# Altium PCB Karta_ILS.PCBDOC (part 4 of 9)
Units mm, origin at the board's own origin, x right, y up, seen from the top; angles counter-clockwise.
Board outline 70 x 83.2 mm, 6 copper layers (TopLayer, Layer 1, Layer 2, Layer 3, Layer 4, Bottom Layer), stack 0.914 mm thick; 406 components, 271 nets, 1327 pads, 719 vias.
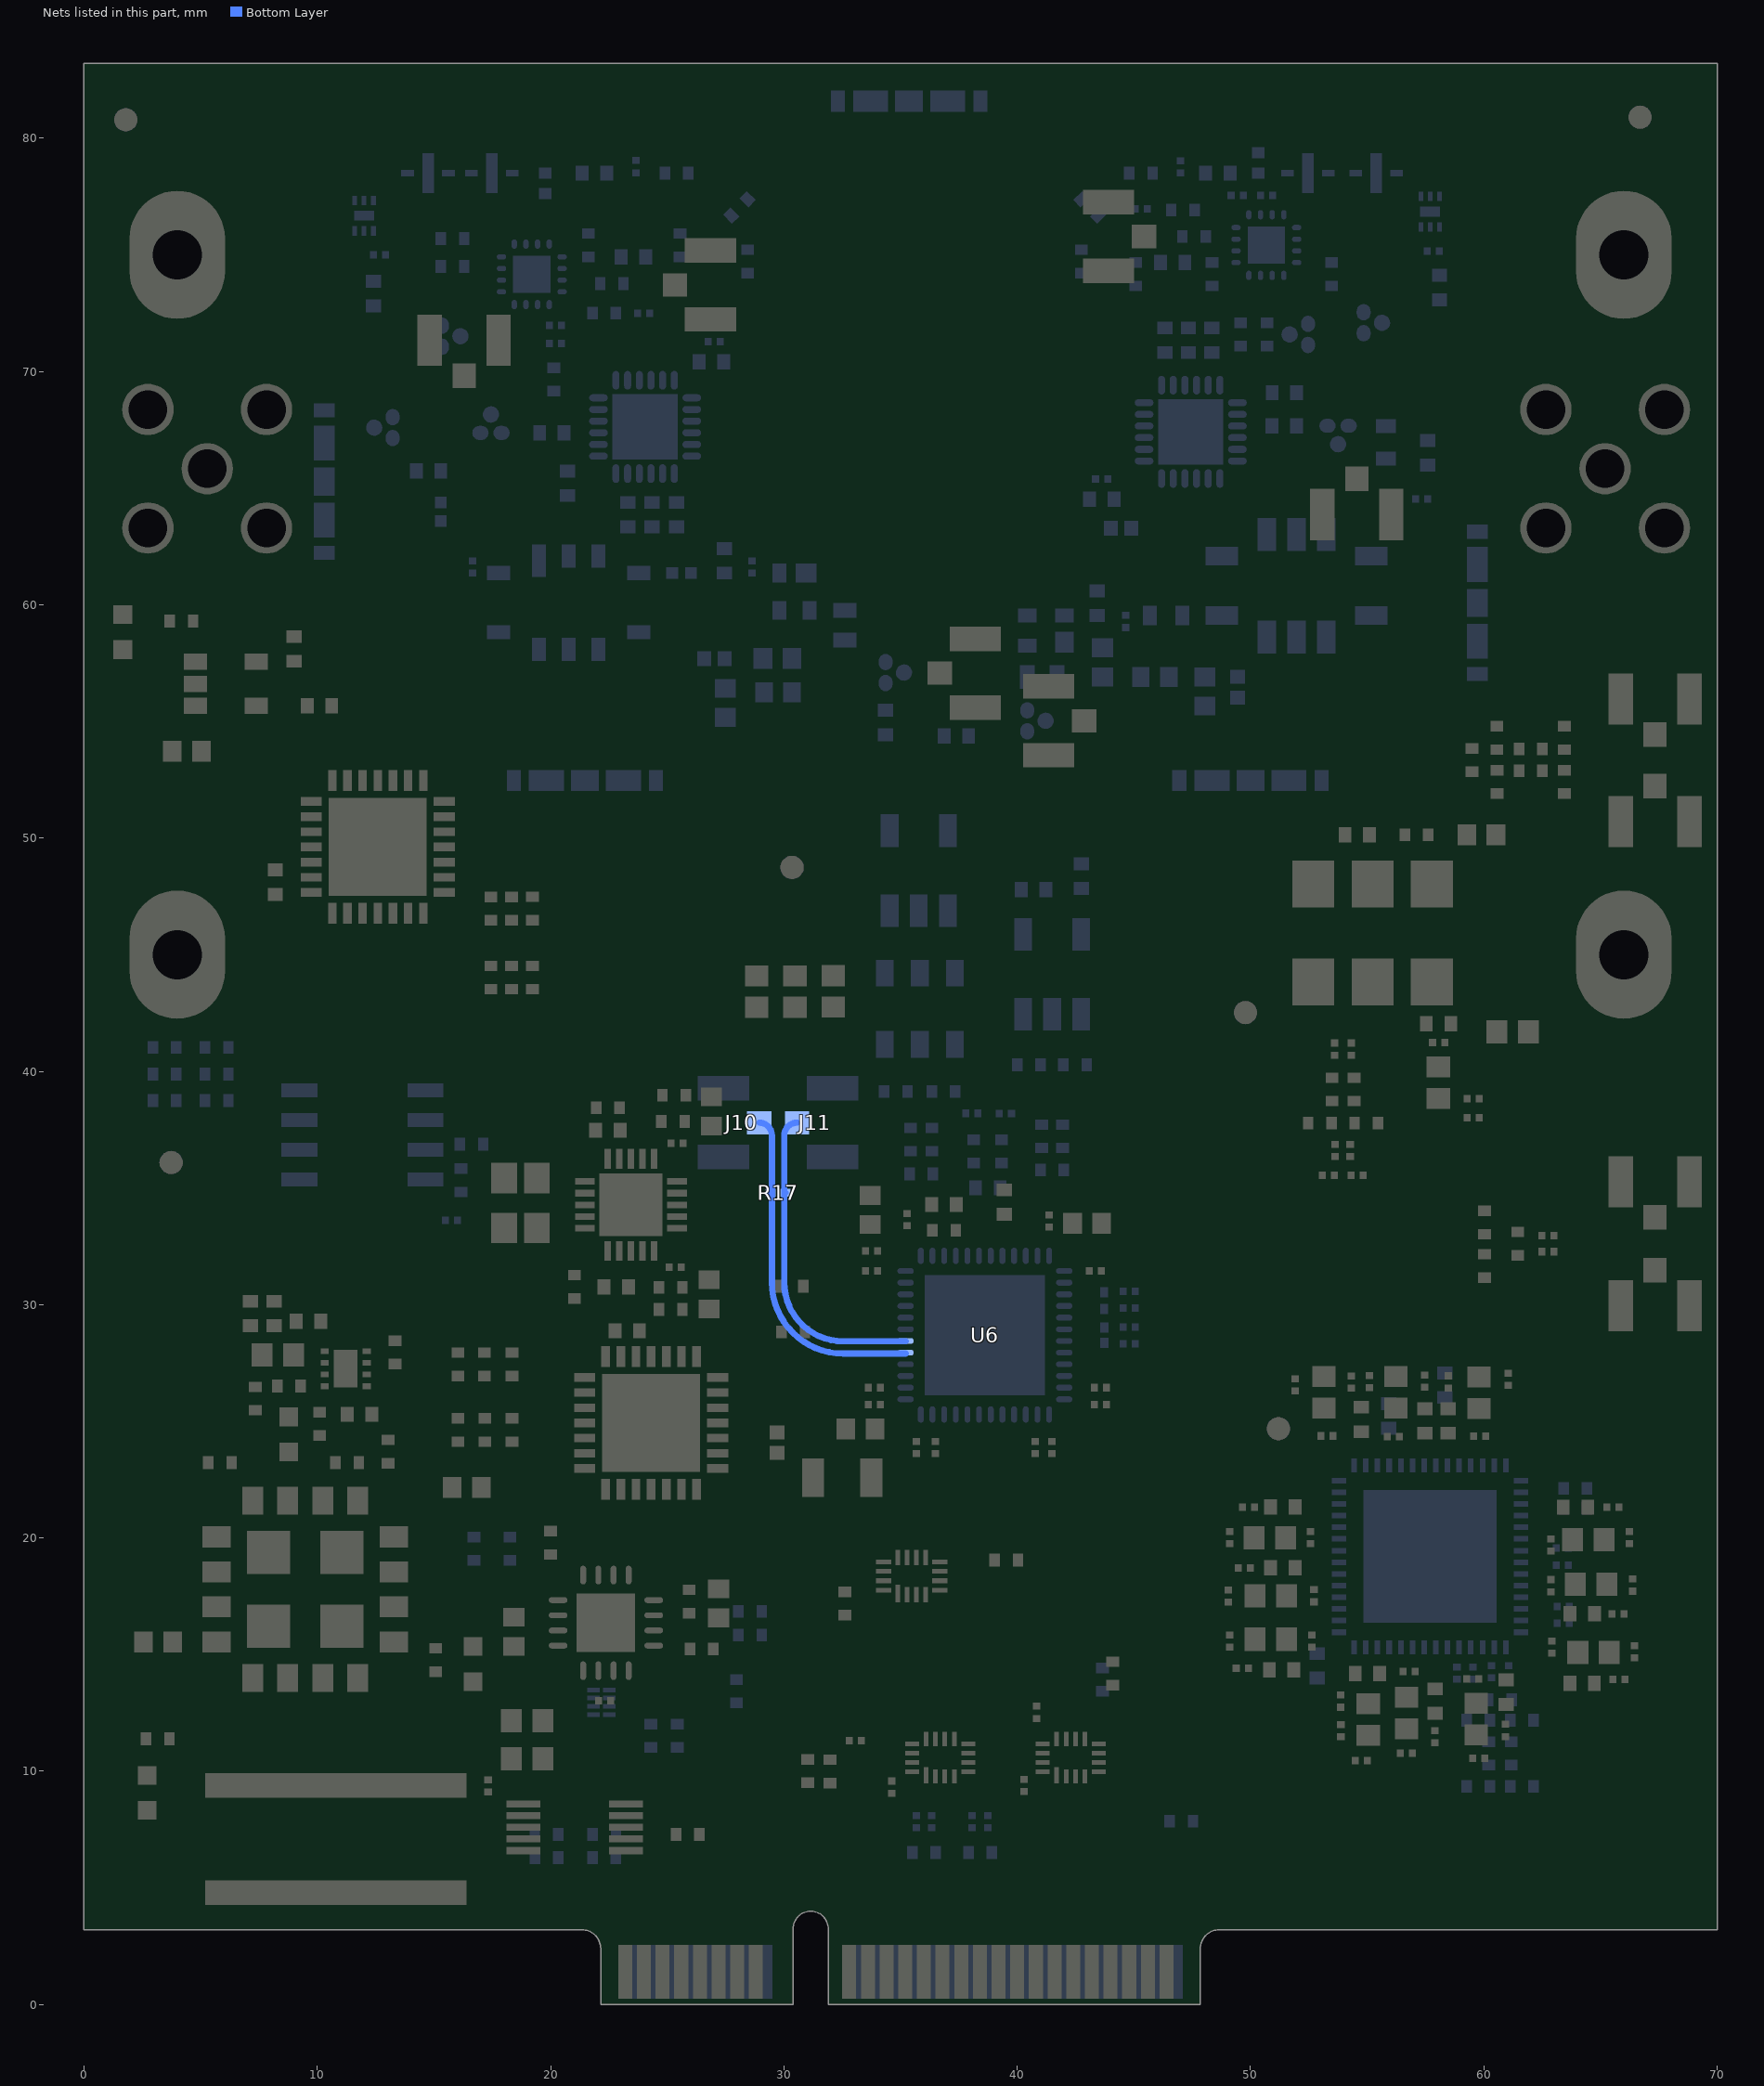
[diagram p6: the nets of this part, all layers, seen from the top]

## Part data (continued)
R27 R34 R41 R47 R53: library part Resistor, "YAGEO - RC0402FR-07100RL. - RES, THICK FILM, 100R, 1%, 0.0625W, 0402, REEL", Case Code (Imperial)=0402, Case Code (Metric)=1005, Manufacturer=Yageo, Manufacturer Part Number=RC0402FR-07100RL, Max Operating Temperature=155°C, Min Operating Temperature=-55°C, Power Rating=62.5mW, Supplier Part Number 1=311-100LRCT-ND, Temperature Coefficient=100ppm/°C, Tolerance=1%, Voltage Rating=50V, Case/Package=0402, Category="Chip SMD Resistors", ComponentLink1Description=https://datasheet.ciiva.com/7849/1784430-7849810.pdf?src-supplier=Element14, ComponentLink1URL=https://datasheet.ciiva.com/7849/1784430-7849810.pdf?src-supplier=Element14, ComponentLink2Description=https://datasheet.ciiva.com/11808/0900766b80c66297-11808765.pdf?src-supplier=RSComponents, ComponentLink2URL=https://datasheet.ciiva.com/11808/0900766b80c66297-11808765.pdf?src-supplier=RSComponents, ComponentLink3Description=https://datasheet.ciiva.com/16740/pyu-rc0402-51-rohs-l-6-r-16740566.pdf?src-supplier=Future+Electronics, ComponentLink3URL=https://datasheet.ciiva.com/16740/pyu-rc0402-51-rohs-l-6-r-16740566.pdf?src-supplier=Future+Electronics, ComponentLink4Description=https://datasheet.ciiva.com/15189/getdatasheetpartid-329466-15189335.pdf?src-supplier=Verical, ComponentLink4URL=https://datasheet.ciiva.com/15189/getdatasheetpartid-329466-15189335.pdf?src-supplier=Verical, ComponentLink5Description=https://datasheet.ciiva.com/28367/1018594-28367226.pdf?src-supplier=Element14, ComponentLink5URL=https://datasheet.ciiva.com/28367/1018594-28367226.pdf?src-supplier=Element14, ComponentLink6Description=https://datasheet.ciiva.com/12667/pyu-rc0402-51-rohs-l-6-r-12667957.pdf?src-supplier=Mouser, ComponentLink6URL=https://datasheet.ciiva.com/12667/pyu-rc0402-51-rohs-l-6-r-12667957.pdf?src-supplier=Mouser, ComponentLink7Description=https://datasheet.ciiva.com/22747/1018594-22747511.pdf?src-supplier=Element14, ComponentLink7URL=https://datasheet.ciiva.com/22747/1018594-22747511.pdf?src-supplier=Element14, Composition="Thick Film", Depth=0.5mm, Height=0.32mm, Lead Free="Lead Free", Length=1mm, Military Standard=Not, Number of Pins=2, Packaging="Tape and Reel", Pricing 1="1=0,10000, 10=0,01600, 100=0,00640, 1000=0,00289, 2500=0,00251, 5000=0,00207 (USD)", REACH SVHC="No SVHC", Resistance=100R, RoHS=Yes, Stock 1=31356128, Supplier 1=Digi-Key, Termination=SMD/SMT, Voltage Rating (DC)=50V, Width=0.5mm
R45 R49: library part Resistor, "RES SMD 4.7 OHM 1% 1/6W 0402", Case Code (Imperial)=0402, Case Code (Metric)=1005, Manufacturer=Susumu, Manufacturer Part Number=RL0510S-4R7-F, Max Operating Temperature=125°C, Max Power Dissipation=167mW, Min Operating Temperature=-55°C, Package Quantity=1, Resistor Type="Thin Film", Supplier Part Number 1=RL05S4.7FCT-ND, Temperature Coefficient=200ppm/°C, Tolerance=1%, Case/Package=0402, Category="Chip SMD Resistors", ComponentLink1Description=https://datasheet.ciiva.com/2488/rl-data-sheet-2488416.pdf?src-supplier=Digi-Key, ComponentLink1URL=https://datasheet.ciiva.com/2488/rl-data-sheet-2488416.pdf?src-supplier=Digi-Key, ComponentLink2Description=https://datasheet.ciiva.com/12913/e-15-16-12913189.pdf?src-supplier=Mouser, ComponentLink2URL=https://datasheet.ciiva.com/12913/e-15-16-12913189.pdf?src-supplier=Mouser, ComponentLink3Description=https://datasheet.ciiva.com/2488/rl-data-sheet-2488414.pdf?src-supplier=Digi-Key, ComponentLink3URL=https://datasheet.ciiva.com/2488/rl-data-sheet-2488414.pdf?src-supplier=Digi-Key, ComponentLink4Description=https://datasheet.ciiva.com/2488/rl-data-sheet-2488415.pdf?src-supplier=Digi-Key, ComponentLink4URL=https://datasheet.ciiva.com/2488/rl-data-sheet-2488415.pdf?src-supplier=Digi-Key, Height=0.018inch, Lead Free="Lead Free", Length=0.039inch, Number of Terminations=2, Packaging="Tape and Reel", Pricing 1="1=0,37000, 10=0,28300, 25=0,21480, 50=0,15980, 100=0,11880, 250=0,10032, 500=0,08600, 1000=0,06552, 5000=0,05569 (USD)", Resistance=4.7R, RoHS=Yes, Stock 1=39223, Supplier 1=Digi-Key, Termination=SMD/SMT, Weight=2.3E-05oz, Width=0.02inch
R46 R48 R52 R55: library part Resistor, "Resistor;  Thick Film;  45.3 Ohms;  0.063 W;  1%;  SMT;  0402;  TCR 37 ppm/DegC;  Tape and Reel", Case Code (Imperial)=0402, Case Code (Metric)=1005, Manufacturer=Vishay, Manufacturer Part Number=CRCW040245R3FKED, Max Operating Temperature=155°C, Min Operating Temperature=-55°C, Package Quantity=10000, Power Rating=63mW, Supplier Part Number 1=541-45.3LCT-ND, Temperature Coefficient=100ppm/°C, Tolerance=1%, Voltage Rating=50V, Case/Package=0402, Category="Chip SMD Resistors", ComponentLink1Description=https://datasheet.ciiva.com/22705/1697337-22705525.pdf?src-supplier=Element14, ComponentLink1URL=https://datasheet.ciiva.com/22705/1697337-22705525.pdf?src-supplier=Element14, ComponentLink2Description=https://datasheet.ciiva.com/5548/dcrcwe3-109170-5548089.pdf?src-supplier=Mouser, ComponentLink2URL=https://datasheet.ciiva.com/5548/dcrcwe3-109170-5548089.pdf?src-supplier=Mouser, ComponentLink3Description=https://datasheet.ciiva.com/7732/1697337-7732015.pdf?src-supplier=Element14, ComponentLink3URL=https://datasheet.ciiva.com/7732/1697337-7732015.pdf?src-supplier=Element14, ComponentLink4Description=https://datasheet.ciiva.com/7743/125364-7743653.pdf?src-supplier=Element14, ComponentLink4URL=https://datasheet.ciiva.com/7743/125364-7743653.pdf?src-supplier=Element14, ComponentLink5Description=https://datasheet.ciiva.com/3256/dcrcwe3-3256541.pdf?src-supplier=Avnet, ComponentLink5URL=https://datasheet.ciiva.com/3256/dcrcwe3-3256541.pdf?src-supplier=Avnet, ComponentLink6Description=https://datasheet.ciiva.com/16781/70201119-16781759.pdf?src-supplier=Allied+Electronics, ComponentLink6URL=https://datasheet.ciiva.com/16781/70201119-16781759.pdf?src-supplier=Allied+Electronics, Composition="Thick Film", Contact Plating=Tin, Depth=0.5mm, Height=0.35mm, Lead Free="Lead Free", Length=1mm, Military Standard=Not, Mount="Surface Mount", Number of Pins=2, Packaging="Tape and Reel", Pricing 1="1=0,10000, 10=0,03600, 100=0,01470, 1000=0,00660, 2500=0,00573, 5000=0,00473 (USD)", Radiation Hardening=No, REACH SVHC=Unknown, Resistance=45.3R, RoHS=Yes, Stock 1=32000, Supplier 1=Digi-Key, Termination=Solder, Voltage Rating (DC)=50V, Weight=2.3E-05oz, Width=0.5mm
R50 R54: library part Resistor, "RES SMD 24.9 OHM 0.1% 1/16W 0402", Case Code (Imperial)=0402, Case Code (Metric)=1005, Manufacturer=Yageo, Manufacturer Part Number=RT0402BRD0724R9L, Max Operating Temperature=125°C, Max Power Dissipation=63mW, Min Operating Temperature=-55°C, Package Quantity=10000, Power Rating=62.5mW, Supplier Part Number 1=YAG4216CT-ND, Temperature Coefficient=25ppm/°C, Tolerance=0.1%, Voltage Rating=50V, Case/Package=0402, Category="Chip SMD Resistors", ComponentLink1Description=https://datasheet.ciiva.com/2582/pyu-rt-1-to-0-05-rohs-l-5-2582254.pdf?src-supplier=Digi-Key, ComponentLink1URL=https://datasheet.ciiva.com/2582/pyu-rt-1-to-0-05-rohs-l-5-2582254.pdf?src-supplier=Digi-Key, Composition="Thin Film", Height=0.014inch, Lead Free="Lead Free", Length=0.039inch, Number of Terminations=2, Packaging="Tape and Reel", Pricing 1="1=0,41000, 10=0,29200, 100=0,11690, 1000=0,05762, 2500=0,05338, 5000=0,04830 (USD)", Resistance=24.9R, RoHS=Yes, Stock 1=12162, Supplier 1=Digi-Key, Termination=SMD/SMT, Voltage Rating (DC)=50V, Width=0.02inch
R61 R62 R72 R73 R74 R108 R109 R114: library part Resistor, Case Code (Imperial)=0402, Case Code (Metric)=1005, Manufacturer 1=Yageo, Manufacturer Part Number 1=RC0402JR-070RL, Max Operating Temperature=155°C, Max Power Dissipation=63mW, Min Operating Temperature=-55°C, Package Quantity=1, Power Rating=62.5mW, Supplier Part Number 1=311-0.0JRCT-ND, Temperature Coefficient=200ppm/°C, Tolerance=5%, Voltage Rating=50V, Case/Package=0402, ComponentLink1Description=https://datasheet.ciiva.com/2452/pyu-rc0402-51-rohs-l-6-2452608.pdf?src-supplier=Digi-Key, ComponentLink1URL=https://datasheet.ciiva.com/2452/pyu-rc0402-51-rohs-l-6-2452608.pdf?src-supplier=Digi-Key, ComponentLink2Description=https://datasheet.ciiva.com/11808/0900766b80c66297-11808195.pdf?src-supplier=RSComponents, ComponentLink2URL=https://datasheet.ciiva.com/11808/0900766b80c66297-11808195.pdf?src-supplier=RSComponents, ComponentLink3Description=https://datasheet.ciiva.com/2452/pyu-r-int-thick-7-2452609.pdf?src-supplier=Digi-Key, ComponentLink3URL=https://datasheet.ciiva.com/2452/pyu-r-int-thick-7-2452609.pdf?src-supplier=Digi-Key, ComponentLink4Description=https://datasheet.ciiva.com/22747/1018594-22747515.pdf?src-supplier=Element14, ComponentLink4URL=https://datasheet.ciiva.com/22747/1018594-22747515.pdf?src-supplier=Element14, ComponentLink5Description=https://datasheet.ciiva.com/7983/1018594-7983535.pdf?src-supplier=Element14, ComponentLink5URL=https://datasheet.ciiva.com/7983/1018594-7983535.pdf?src-supplier=Element14, ComponentLink6Description=https://datasheet.ciiva.com/2452/pyu-r-int-thick-7-2452610.pdf?src-supplier=Digi-Key, ComponentLink6URL=https://datasheet.ciiva.com/2452/pyu-r-int-thick-7-2452610.pdf?src-supplier=Digi-Key, ComponentLink7Description=https://datasheet.ciiva.com/8896/pyu-rc0402-51-rohs-l-6-8896201.pdf?src-supplier=Avnet, ComponentLink7URL=https://datasheet.ciiva.com/8896/pyu-rc0402-51-rohs-l-6-8896201.pdf?src-supplier=Avnet, ComponentLink8Description=https://datasheet.ciiva.com/28386/pyu-rc0402-51-rohs-l-6-28386633.pdf?src-supplier=Avnet+Europe, ComponentLink8URL=https://datasheet.ciiva.com/28386/pyu-rc0402-51-rohs-l-6-28386633.pdf?src-supplier=Avnet+Europe, ComponentLink9Description=https://datasheet.ciiva.com/15189/getdatasheetpartid-326379-15189533.pdf?src-supplier=Verical, ComponentLink9URL=https://datasheet.ciiva.com/15189/getdatasheetpartid-326379-15189533.pdf?src-supplier=Verical, Composition="Thick Film", Contact Plating=Tin,Matte, Depth=0.5mm, Features="Moisture Resistant", Height=0.016inch, Lead Free="Lead Free", Length=1mm, Military Standard=Not, Number of Terminations=2, Packaging="Tape and Reel", Pricing 1="1=0.10000, 10=0.01200, 25=0.00920, 50=0.00680, 100=0.00510, 250=0.00388, 500=0.00308, 1000=0.00227, 5000=0.00163 (USD)", Radiation Hardening=No, REACH SVHC=Unknown, Resistance=0mR, RoHS=Yes, Stock 1=69822252, Supplier 1=Digi-Key, Termination=SMD/SMT, Width=0.02inch
R78_U_RF_ANT_L R78_U_RF_ANT_M: library part Resistor, "TE CONNECTIVITY - CRGP0402F220R - SMD Chip Resistor, 0402 [1005 Metric], 220 ohm, CRGP Series, 50 V, Thick Film, 125 mW", Case/Package=0402, Manufacturer="TE Connectivity", Manufacturer Part Number=CRGP0402F220R, Max Operating Temperature=155°C, Max Power Dissipation=125mW, Min Operating Temperature=-55°C, Resistor Type="Thick Film", Supplier Part Number 1=A130347CT-ND, Temperature Coefficient=100ppm/°C, Tolerance=1%, Category="Chip SMD Resistors", ComponentLink1Description=https://www.te.com/commerce/DocumentDelivery/DDEController?Action=srchrtrv&DocNm=9-1773463-9&DocType=DS&DocLang=English&src-supplier=Digi-Key, ComponentLink1URL=https://www.te.com/commerce/DocumentDelivery/DDEController?Action=srchrtrv&DocNm=9-1773463-9&DocType=DS&DocLang=English&src-supplier=Digi-Key, ComponentLink2Description=https://4donline.ihs.com/images/VipMasterIC/IC/TYEL/TYEL-S-A0005460475/TYEL-S-A0005460475-1.pdf?hkey=52A5661711E402568146F3353EA87419&src-supplier=Farnell, ComponentLink2URL=https://4donline.ihs.com/images/VipMasterIC/IC/TYEL/TYEL-S-A0005460475/TYEL-S-A0005460475-1.pdf?hkey=52A5661711E402568146F3353EA87419&src-supplier=Farnell, ComponentLink3Description=https://4donline.ihs.com/images/VipMasterIC/IC/TYEL/TYEL-S-A0005460475/TYEL-S-A0005460475-1.pdf?hkey=52A5661711E402568146F3353EA87419&src-supplier=Newark, ComponentLink3URL=https://4donline.ihs.com/images/VipMasterIC/IC/TYEL/TYEL-S-A0005460475/TYEL-S-A0005460475-1.pdf?hkey=52A5661711E402568146F3353EA87419&src-supplier=Newark, Number of Terminations=2, Packaging="Tape and Reel", Pricing 1="1=0,10000, 10=0,08400, 100=0,03230, 1000=0,01421, 2500=0,01228, 5000=0,01098 (USD)", Resistance=220R, RoHS=No, Stock 1=193172, Supplier 1=Digi-Key
R80_U_RF_ANT_L R80_U_RF_ANT_M: library part Resistor, "RES SMD 61.9 OHM 1% 1/16W 0402", Case Code (Imperial)=0402, Case Code (Metric)=1005, Manufacturer=Yageo, Manufacturer Part Number=RC0402FR-0761R9L, Max Operating Temperature=155°C, Max Power Dissipation=63mW, Min Operating Temperature=-55°C, Package Quantity=1, Power Rating=62.5mW, Resistor Type="Thick Film", Supplier Part Number 1=311-61.9LRCT-ND, Temperature Coefficient=100ppm/°C, Tolerance=1%, Voltage Rating=50V, Case/Package=0402, Category="Chip SMD Resistors", ComponentLink1Description=https://datasheet.ciiva.com/16741/pyu-rc0402-51-rohs-l-6-r-16741941.pdf?src-supplier=Future+Electronics, ComponentLink1URL=https://datasheet.ciiva.com/16741/pyu-rc0402-51-rohs-l-6-r-16741941.pdf?src-supplier=Future+Electronics, ComponentLink2Description=https://datasheet.ciiva.com/15189/getdatasheetpartid-325045-15189495.pdf?src-supplier=Verical, ComponentLink2URL=https://datasheet.ciiva.com/15189/getdatasheetpartid-325045-15189495.pdf?src-supplier=Verical, ComponentLink3Description=https://datasheet.ciiva.com/2453/pyu-r-int-thick-7-2453706.pdf?src-supplier=Digi-Key, ComponentLink3URL=https://datasheet.ciiva.com/2453/pyu-r-int-thick-7-2453706.pdf?src-supplier=Digi-Key, ComponentLink4Description=https://datasheet.ciiva.com/2453/pyu-r-int-thick-7-2453707.pdf?src-supplier=Digi-Key, ComponentLink4URL=https://datasheet.ciiva.com/2453/pyu-r-int-thick-7-2453707.pdf?src-supplier=Digi-Key, ComponentLink5Description=https://datasheet.ciiva.com/16867/pyu-rc0402-51-rohs-l-6-16867419.pdf?src-supplier=Avnet+Europe, ComponentLink5URL=https://datasheet.ciiva.com/16867/pyu-rc0402-51-rohs-l-6-16867419.pdf?src-supplier=Avnet+Europe, ComponentLink6Description=https://datasheet.ciiva.com/2453/pyu-r-int-thick-7-2453708.pdf?src-supplier=Digi-Key, ComponentLink6URL=https://datasheet.ciiva.com/2453/pyu-r-int-thick-7-2453708.pdf?src-supplier=Digi-Key, ComponentLink7Description=https://datasheet.ciiva.com/28397/pyu-rc0402-51-rohs-l-6-28397965.pdf?src-supplier=Avnet+Europe, ComponentLink7URL=https://datasheet.ciiva.com/28397/pyu-rc0402-51-rohs-l-6-28397965.pdf?src-supplier=Avnet+Europe, ComponentLink8Description=https://datasheet.ciiva.com/8888/pyu-rc0402-51-rohs-l-6-8888591.pdf?src-supplier=Avnet, ComponentLink8URL=https://datasheet.ciiva.com/8888/pyu-rc0402-51-rohs-l-6-8888591.pdf?src-supplier=Avnet, Contact Plating=Tin,Matte,Lead, Depth=0.5mm, Features="Moisture Resistant", Height=0.016inch, Lead Free="Lead Free", Length=1mm, Military Standard=Not, Number of Terminations=2, Packaging="Tape and Reel", Pricing 1="1=0,10000, 10=0,01400, 100=0,00580, 1000=0,00262, 2500=0,00228, 5000=0,00188 (USD)", Radiation Hardening=No, Resistance=61.9R, RoHS=Yes, Stock 1=87319, Supplier 1=Digi-Key, Termination=SMD/SMT, Voltage Rating (DC)=50V, Width=0.5mm, Working Voltage=50V
R81 R82 R92_U_RF_ANT_L R92_U_RF_ANT_M R93_U_RF_ANT_L R93_U_RF_ANT_M: library part Resistor
R83_U_RF_ANT_L R83_U_RF_ANT_M: library part Resistor, "SUSUMU - RR0510R-49R9-D - RES, THIN FILM, 49R9, 0.5%, 0.0625W, 0402", Case Code (Imperial)=0402, Case Code (Metric)=1005, Manufacturer=Susumu, Manufacturer Part Number=RR0510R-49R9-D, Max Operating Temperature=125°C, Min Operating Temperature=-55°C, Power Rating=62.5mW, Resistor Type="Thin Film", Supplier Part Number 1=RR05R49.9DCT-ND, Temperature Coefficient=100ppm/°C, Tolerance=0.5%, Voltage Rating=25V, Case/Package=0402, Category="Chip SMD Resistors", ComponentLink1Description=https://datasheet.ciiva.com/7984/1581132-7984319.pdf?src-supplier=Element14, ComponentLink1URL=https://datasheet.ciiva.com/7984/1581132-7984319.pdf?src-supplier=Element14, Height=0.35mm, Lead Free="Lead Free", Length=1mm, Number of Pins=2, Packaging="Tape and Reel", Pricing 1="1=0,10000, 10=0,07200, 100=0,02910, 1000=0,01309, 2500=0,01136, 5000=0,00939 (USD)", REACH SVHC=Unknown, Resistance=49.9R, RoHS=Yes, Stock 1=493315, Supplier 1=Digi-Key, Termination=SMD/SMT, Voltage Rating (DC)=25V, Width=0.5mm
R84 R126: library part Resistor, "RES SMD 15 OHM 0.5% 1/16W 0603", Case Code (Imperial)=0603, Case Code (Metric)=1608, Manufacturer=Susumu, Manufacturer Part Number=RR0816Q-150-D, Max Operating Temperature=125°C, Max Power Dissipation=63mW, Min Operating Temperature=-55°C, Package Quantity=1, Resistor Type="Thin Film", Supplier Part Number 1=RR08Q15DCT-ND, Temperature Coefficient=50ppm/°C, Tolerance=0.5%, Voltage Rating=75V, Case/Package=0603, Category="Chip SMD Resistors", ComponentLink1Description=https://datasheet.ciiva.com/11820/0900766b80808d64-11820652.pdf?src-supplier=RSComponents, ComponentLink1URL=https://datasheet.ciiva.com/11820/0900766b80808d64-11820652.pdf?src-supplier=RSComponents, ComponentLink2Description=https://datasheet.ciiva.com/2497/rr-data-sheet-2497981.pdf?src-supplier=Digi-Key, ComponentLink2URL=https://datasheet.ciiva.com/2497/rr-data-sheet-2497981.pdf?src-supplier=Digi-Key, ComponentLink3Description=https://datasheet.ciiva.com/2497/rr-data-sheet-2497982.pdf?src-supplier=Digi-Key, ComponentLink3URL=https://datasheet.ciiva.com/2497/rr-data-sheet-2497982.pdf?src-supplier=Digi-Key, ComponentLink4Description=https://datasheet.ciiva.com/2497/rr-data-sheet-2497983.pdf?src-supplier=Digi-Key, ComponentLink4URL=https://datasheet.ciiva.com/2497/rr-data-sheet-2497983.pdf?src-supplier=Digi-Key, Depth=0.8mm, Height=0.4mm, Lead Free="Lead Free", Length=1.6mm, Number of Pins=2, Number of Terminations=2, Packaging="Tape and Reel", Power Rating=63mW, Pricing 1="1=0,10000, 10=0,09300, 100=0,03580, 1000=0,01575, 2500=0,01360 (USD)", REACH SVHC=Unknown, Resistance=15R, RoHS=Yes, Stock 1=15480, Supplier 1=Digi-Key, Termination=SMD/SMT, Voltage Rating (DC)=75V, Width=0.8mm
R86_U_RF_ANT_L R86_U_RF_ANT_M: library part Resistor, "Res Thick Film 0402 40.2K Ohm 1% 1/16W ±100ppm/°C Molded SMD Paper T/R", Case Code (Imperial)=0402, Case Code (Metric)=1005, Manufacturer=Yageo, Manufacturer Part Number=RC0402FR-0740K2L, Max Operating Temperature=155°C, Max Power Dissipation=63mW, Min Operating Temperature=-55°C, Package Quantity=1, Power Rating=62.5mW, Resistor Type="Thick Film", Supplier Part Number 1=311-40.2KLRCT-ND, Temperature Coefficient=100ppm/°C, Tolerance=1%, Voltage Rating=50V, Case/Package=0402, Category="Chip SMD Resistors", ComponentLink1Description=https://datasheet.ciiva.com/8889/pyu-rc0402-51-rohs-l-6-8889263.pdf?src-supplier=Avnet, ComponentLink1URL=https://datasheet.ciiva.com/8889/pyu-rc0402-51-rohs-l-6-8889263.pdf?src-supplier=Avnet, ComponentLink2Description=https://datasheet.ciiva.com/16857/pyu-rc0402-51-rohs-l-6-16857071.pdf?src-supplier=Avnet+Europe, ComponentLink2URL=https://datasheet.ciiva.com/16857/pyu-rc0402-51-rohs-l-6-16857071.pdf?src-supplier=Avnet+Europe, ComponentLink3Description=https://datasheet.ciiva.com/28400/pyu-rc0402-51-rohs-l-6-28400199.pdf?src-supplier=Avnet+Europe, ComponentLink3URL=https://datasheet.ciiva.com/28400/pyu-rc0402-51-rohs-l-6-28400199.pdf?src-supplier=Avnet+Europe, ComponentLink4Description=https://datasheet.ciiva.com/2453/pyu-r-int-thick-7-2453436.pdf?src-supplier=Digi-Key, ComponentLink4URL=https://datasheet.ciiva.com/2453/pyu-r-int-thick-7-2453436.pdf?src-supplier=Digi-Key, ComponentLink5Description=https://datasheet.ciiva.com/2453/pyu-r-int-thick-7-2453437.pdf?src-supplier=Digi-Key, ComponentLink5URL=https://datasheet.ciiva.com/2453/pyu-r-int-thick-7-2453437.pdf?src-supplier=Digi-Key, ComponentLink6Description=https://datasheet.ciiva.com/5557/pyu-rc0402-51-rohs-l-6-r-5557981.pdf?src-supplier=Mouser, ComponentLink6URL=https://datasheet.ciiva.com/5557/pyu-rc0402-51-rohs-l-6-r-5557981.pdf?src-supplier=Mouser, ComponentLink7Description=https://datasheet.ciiva.com/2453/pyu-r-int-thick-7-2453438.pdf?src-supplier=Digi-Key, ComponentLink7URL=https://datasheet.ciiva.com/2453/pyu-r-int-thick-7-2453438.pdf?src-supplier=Digi-Key, ComponentLink8Description=https://datasheet.ciiva.com/16744/pyu-rc0402-51-rohs-l-6-r-16744286.pdf?src-supplier=Future+Electronics, ComponentLink8URL=https://datasheet.ciiva.com/16744/pyu-rc0402-51-rohs-l-6-r-16744286.pdf?src-supplier=Future+Electronics, Contact Plating=Tin,Matte, Depth=0.5mm, Features="Moisture Resistant", Height=0.016inch, Lead Free="Lead Free", Length=0.039inch, Military Standard=Not, Number of Terminations=2, Packaging="Tape and Reel", Pricing 1="1=0,10000, 10=0,01400, 100=0,00580, 1000=0,00262, 2500=0,00228, 5000=0,00188 (USD)", Resistance=40.2kR, RoHS=Yes, Stock 1=625093, Supplier 1=Digi-Key, Termination=SMD/SMT, Voltage Rating (DC)=50V, Width=0.02inch
R90_U_RF_ANT_L R90_U_RF_ANT_M: library part Resistor, "PANASONIC ELECTRONIC COMPONENTS - ERJ2RKF4021X - RES, THICK FILM, 4K02, 1%, 0.1W, 0402", Case Code (Imperial)=0402, Case Code (Metric)=1005, Manufacturer=Panasonic, Manufacturer Part Number=ERJ-2RKF4021X, Max Operating Temperature=155°C, Max Power Dissipation=100mW, Min Operating Temperature=-55°C, Package Quantity=1, Resistor Type="Thick Film", Supplier Part Number 1=P4.02KLCT-ND, Temperature Coefficient=100ppm/°C, Tolerance=1%, Voltage Rating=50V, Case/Package=0402, Category="Chip SMD Resistors", ComponentLink1Description=https://datasheet.ciiva.com/27055/1987273-27055653.pdf?src-supplier=Jameco, ComponentLink1URL=https://datasheet.ciiva.com/27055/1987273-27055653.pdf?src-supplier=Jameco, ComponentLink2Description=https://datasheet.ciiva.com/30122/aoa0000ce2-30122470.pdf?src-supplier=Onlinecomponents.com, ComponentLink2URL=https://datasheet.ciiva.com/30122/aoa0000ce2-30122470.pdf?src-supplier=Onlinecomponents.com, ComponentLink3Description=https://datasheet.ciiva.com/16760/70260748-16760391.pdf?src-supplier=Allied+Electronics, ComponentLink3URL=https://datasheet.ciiva.com/16760/70260748-16760391.pdf?src-supplier=Allied+Electronics, ComponentLink4Description=https://datasheet.ciiva.com/28548/1678782-28548279.pdf?src-supplier=Element14, ComponentLink4URL=https://datasheet.ciiva.com/28548/1678782-28548279.pdf?src-supplier=Element14, ComponentLink5Description=https://datasheet.ciiva.com/5969/426256-5969212.pdf?src-supplier=Farnell, ComponentLink5URL=https://datasheet.ciiva.com/5969/426256-5969212.pdf?src-supplier=Farnell, ComponentLink6Description=https://datasheet.ciiva.com/24027/aoa0000ce2-24027356.pdf?src-supplier=Mouser, ComponentLink6URL=https://datasheet.ciiva.com/24027/aoa0000ce2-24027356.pdf?src-supplier=Mouser, ComponentLink7Description=https://datasheet.ciiva.com/46388/426256-46388156.pdf?src-supplier=Element14, ComponentLink7URL=https://datasheet.ciiva.com/46388/426256-46388156.pdf?src-supplier=Element14, Contact Plating=Tin, Depth=0.5mm, Features="Automotive AEC-Q200", Height=0.35mm, Lead Free="Lead Free", Length=1mm, Military Standard=Not, Mount="Surface Mount", Number of Terminations=2, Packaging="Tape and Reel", Power Rating=100mW, Pricing 1="1=0,10000, 10=0,02200, 100=0,00890, 1000=0,00398, 2500=0,00345, 5000=0,00285 (USD)", REACH SVHC=Unknown, Resistance=4.02kR, RoHS=Yes, Stock 1=51464, Supplier 1=Digi-Key, Termination=SMD/SMT, Voltage Rating (DC)=50V, Width=0.02inch
R97 R98: library part Resistor, Case Code (Imperial)=0402, Case Code (Metric)=1005, Manufacturer 1=Yageo, Manufacturer Part Number 1=RC0402FR-07100KL, Max Operating Temperature=155°C, Max Power Dissipation=63mW, Min Operating Temperature=-55°C, Package Quantity=1, Supplier Part Number 1=311-100KLRCT-ND, Temperature Coefficient=100ppm/°C, Tolerance=1%, Voltage Rating=50V, Case/Package=0402, ComponentLink1Description=https://datasheet.ciiva.com/11819/0900766b80c66297-11819452.pdf?src-supplier=RSComponents, ComponentLink1URL=https://datasheet.ciiva.com/11819/0900766b80c66297-11819452.pdf?src-supplier=RSComponents, ComponentLink2Description=https://datasheet.ciiva.com/2453/pyu-r-int-thick-7-2453361.pdf?src-supplier=Digi-Key, ComponentLink2URL=https://datasheet.ciiva.com/2453/pyu-r-int-thick-7-2453361.pdf?src-supplier=Digi-Key, ComponentLink3Description=https://datasheet.ciiva.com/2453/pyu-r-int-thick-7-2453362.pdf?src-supplier=Digi-Key, ComponentLink3URL=https://datasheet.ciiva.com/2453/pyu-r-int-thick-7-2453362.pdf?src-supplier=Digi-Key, ComponentLink4Description=https://datasheet.ciiva.com/2453/pyu-r-int-thick-7-2453363.pdf?src-supplier=Digi-Key, ComponentLink4URL=https://datasheet.ciiva.com/2453/pyu-r-int-thick-7-2453363.pdf?src-supplier=Digi-Key, ComponentLink5Description=https://datasheet.ciiva.com/22747/1018594-22747509.pdf?src-supplier=Element14, ComponentLink5URL=https://datasheet.ciiva.com/22747/1018594-22747509.pdf?src-supplier=Element14, ComponentLink6Description=https://datasheet.ciiva.com/15189/getdatasheetpartid-323696-15189334.pdf?src-supplier=Verical, ComponentLink6URL=https://datasheet.ciiva.com/15189/getdatasheetpartid-323696-15189334.pdf?src-supplier=Verical, ComponentLink7Description=https://datasheet.ciiva.com/12667/pyu-rc0402-51-rohs-l-6-r-12667930.pdf?src-supplier=Mouser, ComponentLink7URL=https://datasheet.ciiva.com/12667/pyu-rc0402-51-rohs-l-6-r-12667930.pdf?src-supplier=Mouser, Composition="Thick Film", Depth=0.5mm, Features="Moisture Resistant", Height=0.016inch, Lead Free="Lead Free", Length=0.039inch, Military Standard=Not, Number of Terminations=2, Packaging="Tape and Reel", Power Rating=63mW, Pricing 1="1=0,10000, 10=0,01500, 100=0,00600, 1000=0,00270, 2500=0,00235, 5000=0,00194 (USD)", REACH SVHC="No SVHC", Resistance=100kR, RoHS=Yes, Stock 1=51358973, Supplier 1=Digi-Key, Termination=SMD/SMT, Width=0.02inch, Working Voltage=50V
R99: library part Resistor, "RT Series 0402 0.063 W 38.3 kOhms 0.5% ±50 ppm/°C SMT Thin Film Chip Resistor", Case Code (Imperial)=0402, Case Code (Metric)=1005, Manufacturer=Yageo, Manufacturer Part Number=RT0402DRE0738K3L, Max Operating Temperature=155°C, Max Power Dissipation=63mW, Min Operating Temperature=-55°C, Supplier Part Number 1=311-2278-1-ND, Temperature Coefficient=50ppm/°C, Tolerance=0.5%, Voltage Rating (DC)=50V, Case/Package=0402, Category="Chip SMD Resistors", ComponentLink1Description=http://www.yageo.com/documents/recent/PYu-RT_1-to-0.01_RoHS_L_9.pdf?src-supplier=Digi-Key, ComponentLink1URL=http://www.yageo.com/documents/recent/PYu-RT_1-to-0.01_RoHS_L_9.pdf?src-supplier=Digi-Key, ComponentLink2Description=http://www.yageo.com/documents/recent/PYu-RT_1-to-0.05_RoHS_L_(4).pdf?src-supplier=Future+Electronics, ComponentLink2URL=http://www.yageo.com/documents/recent/PYu-RT_1-to-0.05_RoHS_L_(4).pdf?src-supplier=Future+Electronics, Composition="Thin Film", Features="Moisture Resistant", Height=0.014inch, Lead Free="Lead Free", Length=0.039inch, Number of Terminations=2, Packaging="Tape and Reel", Power Rating=63mW, Pricing 1="1=0,20000, 10=0,16800, 100=0,06570, 1000=0,02750, 2500=0,02521, 5000=0,02292 (USD)", Resistance=38.3kR, RoHS=Yes, Stock 1=29268, Supplier 1=Digi-Key, Width=0.02inch
R100: library part Resistor, "Thick Film Resistors - SMD 3.57K OHM 1%", Case Code (Imperial)=0402, Case Code (Metric)=1005, Manufacturer=Yageo, Manufacturer Part Number=RC0402FR-073K57L, Max Operating Temperature=155°C, Max Power Dissipation=63mW, Min Operating Temperature=-55°C, Power Rating=62.5mW, Supplier Part Number 1=YAG3150CT-ND, Temperature Coefficient=100ppm/°C, Tolerance=1%, Voltage Rating=50V, Case/Package=0402, Category="Chip SMD Resistors", ComponentLink1Description=https://datasheet.ciiva.com/16857/pyu-rc0402-51-rohs-l-6-16857623.pdf?src-supplier=Avnet+Europe, ComponentLink1URL=https://datasheet.ciiva.com/16857/pyu-rc0402-51-rohs-l-6-16857623.pdf?src-supplier=Avnet+Europe, ComponentLink2Description=https://datasheet.ciiva.com/8893/pyu-rc0402-51-rohs-l-6-8893597.pdf?src-supplier=Avnet, ComponentLink2URL=https://datasheet.ciiva.com/8893/pyu-rc0402-51-rohs-l-6-8893597.pdf?src-supplier=Avnet, Composition="Thick Film", Contact Plating=Tin,Matte, Depth=0.5mm, Features="Moisture Resistant", Height=0.016inch, Lead Free="Lead Free", Length=1mm, Military Standard=Not, Number of Terminations=2, Packaging="Tape and Reel", Pricing 1="1=0,10000, 10=0,01600, 100=0,00640, 1000=0,00289, 2500=0,00251, 5000=0,00207 (USD)", Resistance=3.57kR, RoHS=Yes, Stock 1=898047, Supplier 1=Digi-Key, Termination=SMD/SMT, Width=0.02inch, Working Voltage=50V
R101: library part Resistor, "Res General Purpose Thick Film 0402 1.15K Ohm 1% 1/16W ±100ppm/°C Molded SMD Paper T/R", Case Code (Imperial)=0402, Case Code (Metric)=1005, Manufacturer=Yageo, Manufacturer Part Number=RC0402FR-071K15L, Max Operating Temperature=155°C, Max Power Dissipation=63mW, Min Operating Temperature=-55°C, Power Rating=62.5mW, Supplier Part Number 1=YAG3033CT-ND, Temperature Coefficient=100ppm/°C, Tolerance=1%, Voltage Rating=50V, Case/Package=0402, Category="Chip SMD Resistors", ComponentLink1Description=https://datasheet.ciiva.com/16856/pyu-rc0402-51-rohs-l-6-16856533.pdf?src-supplier=Avnet+Europe, ComponentLink1URL=https://datasheet.ciiva.com/16856/pyu-rc0402-51-rohs-l-6-16856533.pdf?src-supplier=Avnet+Europe, ComponentLink2Description=https://datasheet.ciiva.com/28418/pyu-rc0402-51-rohs-l-6-28418808.pdf?src-supplier=Avnet+Europe, ComponentLink2URL=https://datasheet.ciiva.com/28418/pyu-rc0402-51-rohs-l-6-28418808.pdf?src-supplier=Avnet+Europe, ComponentLink3Description=https://datasheet.ciiva.com/8895/pyu-rc0402-51-rohs-l-6-8895884.pdf?src-supplier=Avnet, ComponentLink3URL=https://datasheet.ciiva.com/8895/pyu-rc0402-51-rohs-l-6-8895884.pdf?src-supplier=Avnet, ComponentLink4Description=https://datasheet.ciiva.com/26829/getdatasheetpartid-326427-26829948.pdf?src-supplier=Verical, ComponentLink4URL=https://datasheet.ciiva.com/26829/getdatasheetpartid-326427-26829948.pdf?src-supplier=Verical, Composition="Thick Film", Contact Plating=Tin,Matte,Lead, Depth=0.5mm, Features="Moisture Resistant", Height=0.016inch, Lead Free="Lead Free", Length=1mm, Military Standard=Not, Number of Terminations=2, Packaging="Tape and Reel", Pricing 1="1=0,10000, 10=0,01600, 100=0,00640, 1000=0,00289, 2500=0,00251, 5000=0,00207 (USD)", Radiation Hardening=No, Resistance=1.15kR, RoHS=Yes, Stock 1=186720, Supplier 1=Digi-Key, Termination=SMD/SMT, Voltage Rating (DC)=50V, Width=0.02inch
R102: library part Resistor, Case Code (Imperial)=0402, Case Code (Metric)=1005, Manufacturer=Panasonic, Manufacturer Part Number=ERA-2AEB1871X, Max Operating Temperature=155°C, Max Power Dissipation=63mW, Min Operating Temperature=-55°C, Package Quantity=10000, Power Rating=62.5mW, Supplier Part Number 1=P1.87KDCCT-ND, Temperature Coefficient=25ppm/°C, Tolerance=0.1%, Case/Package=0402, ComponentLink1Description=https://media.digikey.com/pdf/Data%20Sheets/Panasonic%20Resistors%20Thermistors%20PDFs/ERA_Series_LE.pdf?src-supplier=Digi-Key, ComponentLink1URL=https://media.digikey.com/pdf/Data%20Sheets/Panasonic%20Resistors%20Thermistors%20PDFs/ERA_Series_LE.pdf?src-supplier=Digi-Key, ComponentLink2Description=http://components.arrow.com/part/dataview/48289000S454828N1386?src-supplier=Arrow, ComponentLink2URL=http://components.arrow.com/part/dataview/48289000S454828N1386?src-supplier=Arrow, ComponentLink3Description=http://www.mouser.com/ds/2/315/AOA0000C237-1100991.pdf?src-supplier=Mouser, ComponentLink3URL=http://www.mouser.com/ds/2/315/AOA0000C237-1100991.pdf?src-supplier=Mouser, ComponentLink4Description=http://www.onlinecomponents.com/datasheet/era-2aeb1871x.aspx?p=44473586&src-supplier=Onlinecomponents.com, ComponentLink4URL=http://www.onlinecomponents.com/datasheet/era-2aeb1871x.aspx?p=44473586&src-supplier=Onlinecomponents.com, ComponentLink5Description=https://industrial.panasonic.com/cdbs/www-data/pdf/RDM0000/AOA0000C307.pdf?src-supplier=Digi-Key, ComponentLink5URL=https://industrial.panasonic.com/cdbs/www-data/pdf/RDM0000/AOA0000C307.pdf?src-supplier=Digi-Key, Composition="Thin Film", Height=0.016inch, Lead Free="Lead Free", Length=0.039inch, Mount="Surface Mount", Number of Terminations=2, Packaging="Tape and Reel", Pricing 1="1 = 0,45000, 10 = 0,32100, 100 = 0,12830, 1000 = 0,06322, 2500 = 0,05858, 5000 = 0,05300 (USD)", Resistance=1.87kR, RoHS=Yes, Stock 1=25484, Supplier 1=Digi-Key, Width=0.02inch
R103: library part Resistor, Case Code (Imperial)=0402, Case Code (Metric)=1005, Manufacturer=Panasonic, Manufacturer Part Number=ERA-2AEB152X, Max Operating Temperature=155°C, Max Power Dissipation=63mW, Min Operating Temperature=-55°C, Package Quantity=10000, Supplier Part Number 1=P1.5KDCCT-ND, Temperature Coefficient=25ppm/°C, Tolerance=0.1%, Voltage Rating=25V, Case/Package=0402, ComponentLink1Description=https://datasheet.ciiva.com/11812/0900766b80beefcc-11812726.pdf?src-supplier=RSComponents, ComponentLink1URL=https://datasheet.ciiva.com/11812/0900766b80beefcc-11812726.pdf?src-supplier=RSComponents, ComponentLink2Description=https://datasheet.ciiva.com/9198/aoa0000ce26-9198134.pdf?src-supplier=Avnet, ComponentLink2URL=https://datasheet.ciiva.com/9198/aoa0000ce26-9198134.pdf?src-supplier=Avnet, ComponentLink3Description=https://datasheet.ciiva.com/17214/aoa0000ce26-17214729.pdf?src-supplier=Avnet+Europe, ComponentLink3URL=https://datasheet.ciiva.com/17214/aoa0000ce26-17214729.pdf?src-supplier=Avnet+Europe, ComponentLink4Description=https://datasheet.ciiva.com/24071/aoa0000ce26-197354-24071641.pdf?src-supplier=Mouser, ComponentLink4URL=https://datasheet.ciiva.com/24071/aoa0000ce26-197354-24071641.pdf?src-supplier=Mouser, Composition="Thin Film,Metal Film", Contact Plating=Tin, Depth=0.5mm, Features="Automotive AEC-Q200", Height=0.35mm, Lead Free="Lead Free", Length=1mm, Military Standard=Not, Mount="Surface Mount", Number of Terminations=2, Packaging="Tape and Reel", Power Rating=63mW, Pricing 1="1 = 0,43000, 10 = 0,30500, 100 = 0,12220, 1000 = 0,06021, 2500 = 0,05579, 5000 = 0,05047 (USD)", Radiation Hardening=No, REACH SVHC="No SVHC", Resistance=1.5kR, RoHS=Yes, Stock 1=3629, Supplier 1=Digi-Key, Termination=SMD/SMT, Voltage Rating (DC)=25V, Width=0.02inch
R104 R105: library part Resistor, "RES SMD 20K OHM 1% 1/16W 0402", Case Code (Imperial)=0402, Case Code (Metric)=1005, Manufacturer=Vishay, Manufacturer Part Number=CRCW040220K0FKED, Max Operating Temperature=155°C, Max Power Dissipation=63mW, Min Operating Temperature=-55°C, Package Quantity=10, Supplier Part Number 1=51X8496, Temperature Coefficient=100ppm/°C, Tolerance=1%, Voltage Rating=50V, Case/Package=0402, Category="Chip SMD Resistors", ComponentLink1Description=https://datasheet.ciiva.com/11810/0900766b80d98824-11810023.pdf?src-supplier=RSComponents, ComponentLink1URL=https://datasheet.ciiva.com/11810/0900766b80d98824-11810023.pdf?src-supplier=RSComponents, ComponentLink2Description=https://datasheet.ciiva.com/2463/dcrcwe3-2463139.pdf?src-supplier=Digi-Key, ComponentLink2URL=https://datasheet.ciiva.com/2463/dcrcwe3-2463139.pdf?src-supplier=Digi-Key, ComponentLink3Description=https://datasheet.ciiva.com/2463/dcrcwe3-2463140.pdf?src-supplier=Digi-Key, ComponentLink3URL=https://datasheet.ciiva.com/2463/dcrcwe3-2463140.pdf?src-supplier=Digi-Key, ComponentLink4Description=https://datasheet.ciiva.com/16886/dcrcwe3-16886581.pdf?src-supplier=Avnet+Europe, ComponentLink4URL=https://datasheet.ciiva.com/16886/dcrcwe3-16886581.pdf?src-supplier=Avnet+Europe, ComponentLink5Description=https://datasheet.ciiva.com/15159/getdatasheetpartid-93312-15159927.pdf?src-supplier=Verical, ComponentLink5URL=https://datasheet.ciiva.com/15159/getdatasheetpartid-93312-15159927.pdf?src-supplier=Verical, ComponentLink6Description=https://datasheet.ciiva.com/2463/dcrcwe3-2463141.pdf?src-supplier=Digi-Key, ComponentLink6URL=https://datasheet.ciiva.com/2463/dcrcwe3-2463141.pdf?src-supplier=Digi-Key, ComponentLink7Description=https://datasheet.ciiva.com/3256/dcrcwe3-3256213.pdf?src-supplier=Avnet, ComponentLink7URL=https://datasheet.ciiva.com/3256/dcrcwe3-3256213.pdf?src-supplier=Avnet, ComponentLink8Description=https://datasheet.ciiva.com/16725/70201119-16725214.pdf?src-supplier=Allied+Electronics, ComponentLink8URL=https://datasheet.ciiva.com/16725/70201119-16725214.pdf?src-supplier=Allied+Electronics, Composition="Thick Film", Contact Plating=Tin, Depth=0.5mm, Features="Automotive AEC-Q200", Height=0.35mm, Lead Free="Lead Free", Length=1mm, Military Standard=Not, Mount="Surface Mount", Number of Pins=2, Number of Terminations=2, Packaging="Tape and Reel", Power Rating=63mW, Radiation Hardening=No, REACH SVHC=Unknown, Resistance=20kR, RoHS=Yes, Supplier 1=Newark, Termination=SMD/SMT, Voltage Rating (DC)=50V, Weight=2.3E-05oz, Width=0.5mm, Working Voltage=50V
R106: "RES SMD 5 MOHM 5W 4320 WIDE", Case/Package=Metal, Manufacturer=Ohmite, Max Operating Temperature=155°C, Max Power Dissipation=5W, Min Operating Temperature=-55°C, Package Quantity=1, Resistance=5mR, Supplier Part Number 1=FCSL110R005FERCT-ND, Temperature Coefficient=50ppm/°C, Tolerance=1%, ComponentLink1Description=https://datasheet.ciiva.com/2484/res-fcsl-2484643.pdf?src-supplier=Digi-Key, ComponentLink1URL=https://datasheet.ciiva.com/2484/res-fcsl-2484643.pdf?src-supplier=Digi-Key, ComponentLink2Description=https://datasheet.ciiva.com/2484/res-fcsl-2484644.pdf?src-supplier=Digi-Key, ComponentLink2URL=https://datasheet.ciiva.com/2484/res-fcsl-2484644.pdf?src-supplier=Digi-Key, ComponentLink3Description=https://datasheet.ciiva.com/2484/res-fcsl-2484645.pdf?src-supplier=Digi-Key, ComponentLink3URL=https://datasheet.ciiva.com/2484/res-fcsl-2484645.pdf?src-supplier=Digi-Key, ComponentLink4Description=https://datasheet.ciiva.com/6181/fcsl-6181333.pdf?src-supplier=Farnell, ComponentLink4URL=https://datasheet.ciiva.com/6181/fcsl-6181333.pdf?src-supplier=Farnell, ComponentLink5Description=https://datasheet.ciiva.com/46422/1812595-46422917.pdf?src-supplier=Element14, ComponentLink5URL=https://datasheet.ciiva.com/46422/1812595-46422917.pdf?src-supplier=Element14, ComponentLink6Description=https://datasheet.ciiva.com/8080/fcsl-8080343.pdf?src-supplier=Element14, ComponentLink6URL=https://datasheet.ciiva.com/8080/fcsl-8080343.pdf?src-supplier=Element14, Composition="Metal Foil", Depth=5mm, Features="Moisture Resistant", Height=0.028inch, Length=0.197inch, Manufacturer Part Number=FCSL110R005FER, Number of Pins=2, Number of Terminations=2, Packaging="Tape and Reel", Power Rating=5W, Pricing 1="1 = 2,79000, 10 = 2,47700, 25 = 2,29720, 50 = 2,16220, 100 = 1,89190, 250 = 1,62164, 500 = 1,35136 (USD)", REACH SVHC=Unknown, RoHS=Yes, Stock 1=3877, Supplier 1=Digi-Key, Termination=SMD/SMT, Width=11mm
R120 R124: library part Resistor, "RES 560 OHM 5% 1/16W 0402", Case Code (Imperial)=0402, Case Code (Metric)=1005, Manufacturer="Stackpole Electronics", Manufacturer Part Number=RMCF0402JT560R, Max Operating Temperature=155°C, Max Power Dissipation=63mW, Min Operating Temperature=-55°C, Resistor Type="Thick Film", Supplier Part Number 1=RMCF0402JT560RCT-ND, Temperature Coefficient=100ppm/°C, Tolerance=5%, Case/Package=0402, Category="Chip SMD Resistors", ComponentLink1Description=http://components.arrow.com/part/dataview/50506686S89619N1174?src-supplier=Arrow+Electronics, ComponentLink1URL=http://components.arrow.com/part/dataview/50506686S89619N1174?src-supplier=Arrow+Electronics, ComponentLink2Description=https://www.seielect.com/catalog/SEI-Packaging.pdf?src-supplier=Digi-Key, ComponentLink2URL=https://www.seielect.com/catalog/SEI-Packaging.pdf?src-supplier=Digi-Key, ComponentLink3Description=http://www.seielect.com/Catalog/SEI-rmc.pdf?src-supplier=Future+Electronics, ComponentLink3URL=http://www.seielect.com/Catalog/SEI-rmc.pdf?src-supplier=Future+Electronics, ComponentLink4Description=https://www.seielect.com/catalog/SEI-RMCF_RMCP.pdf?src-supplier=Avnet, ComponentLink4URL=https://www.seielect.com/catalog/SEI-RMCF_RMCP.pdf?src-supplier=Avnet, Contact Plating=Tin,Matte, Features="Automotive AEC-Q200", Height=0.016inch, Lead Free="Lead Free", Length=0.039inch, Mount="Surface Mount", Number of Terminations=2, Packaging="Tape and Reel", Power Rating=63mW, Pricing 1="1=0,10000, 10=0,01000, 100=0,00410, 1000=0,00186, 2500=0,00161, 5000=0,00133 (USD)", Radiation Hardening=No, Resistance=560R, RoHS=Yes, Stock 1=65817, Supplier 1=Digi-Key, Width=0.02inch
T1 T2: Case/Package=SMD/SMT, Manufacturer="TE Connectivity MA-COM", Max DC Current=30mA, Max Operating Temperature=85°C, Min Operating Temperature=-40°C, Package Quantity=2000, Power Rating=250mW, Supplier Part Number 1=937-MABA007159000000, ComponentLink1Description=https://datasheet.ciiva.com/3295/maba-007159-000000-3295941.pdf?src-supplier=Avnet, ComponentLink1URL=https://datasheet.ciiva.com/3295/maba-007159-000000-3295941.pdf?src-supplier=Avnet, ComponentLink2Description=https://datasheet.ciiva.com/4550/maba-007159-000000-13414-4550885.pdf?src-supplier=Mouser, ComponentLink2URL=https://datasheet.ciiva.com/4550/maba-007159-000000-13414-4550885.pdf?src-supplier=Mouser, ComponentLink3Description=https://datasheet.ciiva.com/29655/maba-007159-000000-29655720.pdf?src-supplier=Digi-Key, ComponentLink3URL=https://datasheet.ciiva.com/29655/maba-007159-000000-29655720.pdf?src-supplier=Digi-Key, ComponentLink4Description=https://datasheet.ciiva.com/29655/maba-007159-000000-29655722.pdf?src-supplier=Digi-Key, ComponentLink4URL=https://datasheet.ciiva.com/29655/maba-007159-000000-29655722.pdf?src-supplier=Digi-Key, Depth=3.81mm, Height=2.67mm, Lead Free="Lead Free", Lead/Base Style="Gull Wing", Length=3.81mm, Manufacturer Part Number=MABA-007159-000000, Mount="Surface Mount", Number of Pins=5, Packaging="Tape and Reel", Pricing 1="1 = 1,75000, 10 = 1,41000, 50 = 1,41000, 100 = 1,13000, 1000 = 0,88000, 10000 = 0,68800 (USD)", Radiation Hardening=No, RoHS=Yes, Stock 1=6455, Supplier 1=Mouser, Termination=SMD/SMT, Turns Ratio=1:1, Width=3.81mm
T3: "Wideband RF transformer, SMT, RoHS", Current Rating=250mA, DC Resistance (DCR)=120mR, Inductance=10uH, Isolation Voltage=300V, Manufacturer=Coilcraft, Max Operating Temperature=85°C, Min Operating Temperature=-40°C, Package Quantity=100, Power Rating=250mW, Supplier Part Number 1=994-WBC1-1LB, Category=Transformers, ComponentLink1Description=http://www.farnell.com/datasheets/1870445.pdf?src-supplier=Farnell, ComponentLink1URL=http://www.farnell.com/datasheets/1870445.pdf?src-supplier=Farnell, ComponentLink2Description=http://www.mouser.com/ds/2/597/wbc-463492.pdf?src-supplier=Mouser, ComponentLink2URL=http://www.mouser.com/ds/2/597/wbc-463492.pdf?src-supplier=Mouser, ComponentLink3Description=http://www.farnell.com/datasheets/1870445.pdf?src-supplier=Element14, ComponentLink3URL=http://www.farnell.com/datasheets/1870445.pdf?src-supplier=Element14, Core Material=Ferrite, Height=3.05mm, Lead Free="Contains Lead", Length=4.45mm, Manufacturer Part Number=WBC1-1LB, Packaging="Tape and Reel", Pricing 1="1=3,70000, 10=3,33000, 50=2,96000, 100=2,59000, 200=2,33000, 500=2,14000, 750=1,99000 (USD)", REACH SVHC="No SVHC", RoHS=Yes, Shielding=Unshielded, Stock 1=958, Supplier 1=Mouser, Termination=SMD/SMT, Width=4.19mm
U1: library part 171031801, "DC DC CONVERTER 0.8V-17V", Input Voltage=4-18V, Manufacturer="Wurth Elektronik", Max Input Voltage=18V, Max Operating Temperature=85°C, Max Output Current=3A, Min Input Voltage=4V, Min Operating Temperature=-40°C, Operating Temperature="-40 to +125degC", Output Voltage=0.8-17V, Supplier Part Number 1=732-12297-1-ND, Voltage - Output 1=17V, Category="Board Mount Modules", ComponentLink1Description=Manufacturer, ComponentLink1URL=http://www.we-online.de, ComponentLink2Description=Datasheet, ComponentLink2URL=https://katalog.we-online.de/pm/datasheet/171031801.pdf, ComponentLink3Description=https://katalog.we-online.de/pm/datasheet/171031801.pdf?src-supplier=Digi-Key, ComponentLink3URL=https://katalog.we-online.de/pm/datasheet/171031801.pdf?src-supplier=Digi-Key, Efficiency=95%, Features=UVLO,OCP,OTP,SCP, Manufacturer Part Number=171031801, Mount="Surface Mount", Mounting Technology=SMT, Number of Outputs=1, Output Current=3A, Packaging="Tape and Reel", Pricing 1="1=9,28000, 10=8,53900, 50=8,00360 (USD)", Published Date="April 2020", RoHS=No, Size=LGA-16EP, Stock 1=530, Supplier 1=Digi-Key
U2: "IC REG LINEAR 5V 300MA SOT23-5", Case/Package=SOT-23-5, Dropout Voltage=250mV, Manufacturer=Diodes, Max Input Voltage=13.2V, Max Operating Temperature=125°C, Max Output Current=300mA, Min Input Voltage=2.5V, Min Operating Temperature=-40°C, Output Voltage=5V, Package Quantity=3000, Power Supply Rejection Ratio (PSRR)=75dB, Quiescent Current=150uA, Supplier Part Number 1=AP2210K-5.0TRG1DICT-ND, Accuracy=1%, Category="Voltage Regulators - Linear", ComponentLink1Description=https://datasheet.ciiva.com/29569/ap2210-29569974.pdf?src-supplier=Digi-Key, ComponentLink1URL=https://datasheet.ciiva.com/29569/ap2210-29569974.pdf?src-supplier=Digi-Key, ComponentLink2Description=https://datasheet.ciiva.com/29569/ap2210-29569975.pdf?src-supplier=Digi-Key, ComponentLink2URL=https://datasheet.ciiva.com/29569/ap2210-29569975.pdf?src-supplier=Digi-Key, ComponentLink3Description=https://datasheet.ciiva.com/29569/ap2210-29569976.pdf?src-supplier=Digi-Key, ComponentLink3URL=https://datasheet.ciiva.com/29569/ap2210-29569976.pdf?src-supplier=Digi-Key, Lead Free="Lead Free", Manufacturer Part Number=AP2210K-5.0TRG1, Mount="Surface Mount", Number of Outputs=1, Number of Pins=5, Number of Regulators=1, Output Current=300mA, Output Type=Fixed, Packaging="Tape and Reel", Polarity=Positive, Pricing 1="1=0,42000, 10=0,34200, 25=0,31280, 100=0,21090, 250=0,17452, 500=0,15998, 1000=0,11999 (USD)", RoHS=Yes, Stock 1=36767, Supplier 1=Digi-Key, Weight=0.001058oz
U3: "IC REG LIN POS ADJ 500MA 8LFCSP", Case/Package=MSOP, Dropout Voltage=130mV, Manufacturer="Analog Devices", Max Input Voltage=5.5V, Max Operating Temperature=125°C, Max Output Current=500mA, Max Output Voltage=5V, Max Supply Current=210uA, Min Current Limit=550mA, Min Input Voltage=2.3V, Min Operating Temperature=-40°C, Min Output Voltage=800mV, Nominal Supply Current=45uA, Power Supply Rejection Ratio (PSRR)=60dB, Reference Voltage=500mV, Supplier Part Number 1=2457144, Accuracy=1%, ComponentLink1Description=https://datasheet.ciiva.com/17365/adp124-125-17365589.pdf?src-supplier=Avnet+Europe, ComponentLink1URL=https://datasheet.ciiva.com/17365/adp124-125-17365589.pdf?src-supplier=Avnet+Europe, ComponentLink2Description=https://datasheet.ciiva.com/2056/adp124-125-2056955.pdf?src-supplier=Digi-Key, ComponentLink2URL=https://datasheet.ciiva.com/2056/adp124-125-2056955.pdf?src-supplier=Digi-Key, ComponentLink3Description=https://datasheet.ciiva.com/2056/adp124-125-2056954.pdf?src-supplier=Digi-Key, ComponentLink3URL=https://datasheet.ciiva.com/2056/adp124-125-2056954.pdf?src-supplier=Digi-Key, ComponentLink4Description=https://datasheet.ciiva.com/2056/adp124-125-2056956.pdf?src-supplier=Digi-Key, ComponentLink4URL=https://datasheet.ciiva.com/2056/adp124-125-2056956.pdf?src-supplier=Digi-Key, ComponentLink5Description=https://datasheet.ciiva.com/48694/001251247-da-01-en-ic-reg-l-adj-adp125acpz-r7-lfcspud-8-adi-48694599.pdf?src-supplier=Conrad, ComponentLink5URL=https://datasheet.ciiva.com/48694/001251247-da-01-en-ic-reg-l-adj-adp125acpz-r7-lfcspud-8-adi-48694599.pdf?src-supplier=Conrad, ComponentLink6Description=http://datasheet.octopart.com/ADP125ACPZ-R7-Analog-Devices-datasheet-11525030.pdf?src-supplier=Newark, ComponentLink6URL=http://datasheet.octopart.com/ADP125ACPZ-R7-Analog-Devices-datasheet-11525030.pdf?src-supplier=Newark, ComponentLink7Description=http://datasheet.octopart.com/ADP125ACPZ-R7-Analog-Devices-datasheet-38878834.pdf?src-supplier=Newark, ComponentLink7URL=http://datasheet.octopart.com/ADP125ACPZ-R7-Analog-Devices-datasheet-38878834.pdf?src-supplier=Newark, ComponentLink8Description=http://datasheet.octopart.com/ADP125ACPZ-R7-Analog-Devices-datasheet-10623001.pdf?src-supplier=Analog+Devices, ComponentLink8URL=http://datasheet.octopart.com/ADP125ACPZ-R7-Analog-Devices-datasheet-10623001.pdf?src-supplier=Analog+Devices, ComponentLink9Description=http://datasheet.octopart.com/ADP125ACPZ-R7-Analog-Devices-datasheet-8638579.pdf?src-supplier=Analog+Devices, ComponentLink9URL=http://datasheet.octopart.com/ADP125ACPZ-R7-Analog-Devices-datasheet-8638579.pdf?src-supplier=Analog+Devices, ComponentLink10Description=http://datasheet.octopart.com/ADP125ACPZ-R7-Analog-Devices-datasheet-11776558.pdf?src-supplier=Arrow, ComponentLink10URL=http://datasheet.octopart.com/ADP125ACPZ-R7-Analog-Devices-datasheet-11776558.pdf?src-supplier=Arrow, Contact Plating=Gold, Height=0.6mm, Lead Free="Contains Lead", Length=2mm, Manufacturer 2="Analog Devices", Manufacturer Part Number=ADP125ACPZ-R7, Manufacturer Part Number 2=ADP125ACPZ-R7, Number of Outputs=1, Number of Pins=8, Number of Regulators=1, Operating Supply Current=45uA, Output Current=500mA, Output Type=Adjustable, Output Voltage=5V, Packaging="Tape and Reel", Polarity=Positive, Pricing 2="1=1.39000, 10=1.23900, 25=1.17600, 100=0.96600, 250=0.90300, 500=0.79800, 1000=0.63000 (USD)", Quiescent Current=45uA, REACH SVHC="No SVHC", RoHS=Yes, Stock 1=261, Stock 2=12322, Supplier 1=Farnell, Supplier 2=Digi-Key, Supplier Part Number 2=ADP125ACPZ-R7CT-ND, Width=2mm